# Altium PCB EMGintegrated.PcbDoc
Units mil, origin at the board's own origin, x right, y up, seen from the top; angles counter-clockwise.
Board outline 1400 x 890 mil, 4 copper layers (Signal1, Ground, Power, Signal2), stack 61.2 mil thick; 62 components, 38 nets, 219 pads, 38 vias.
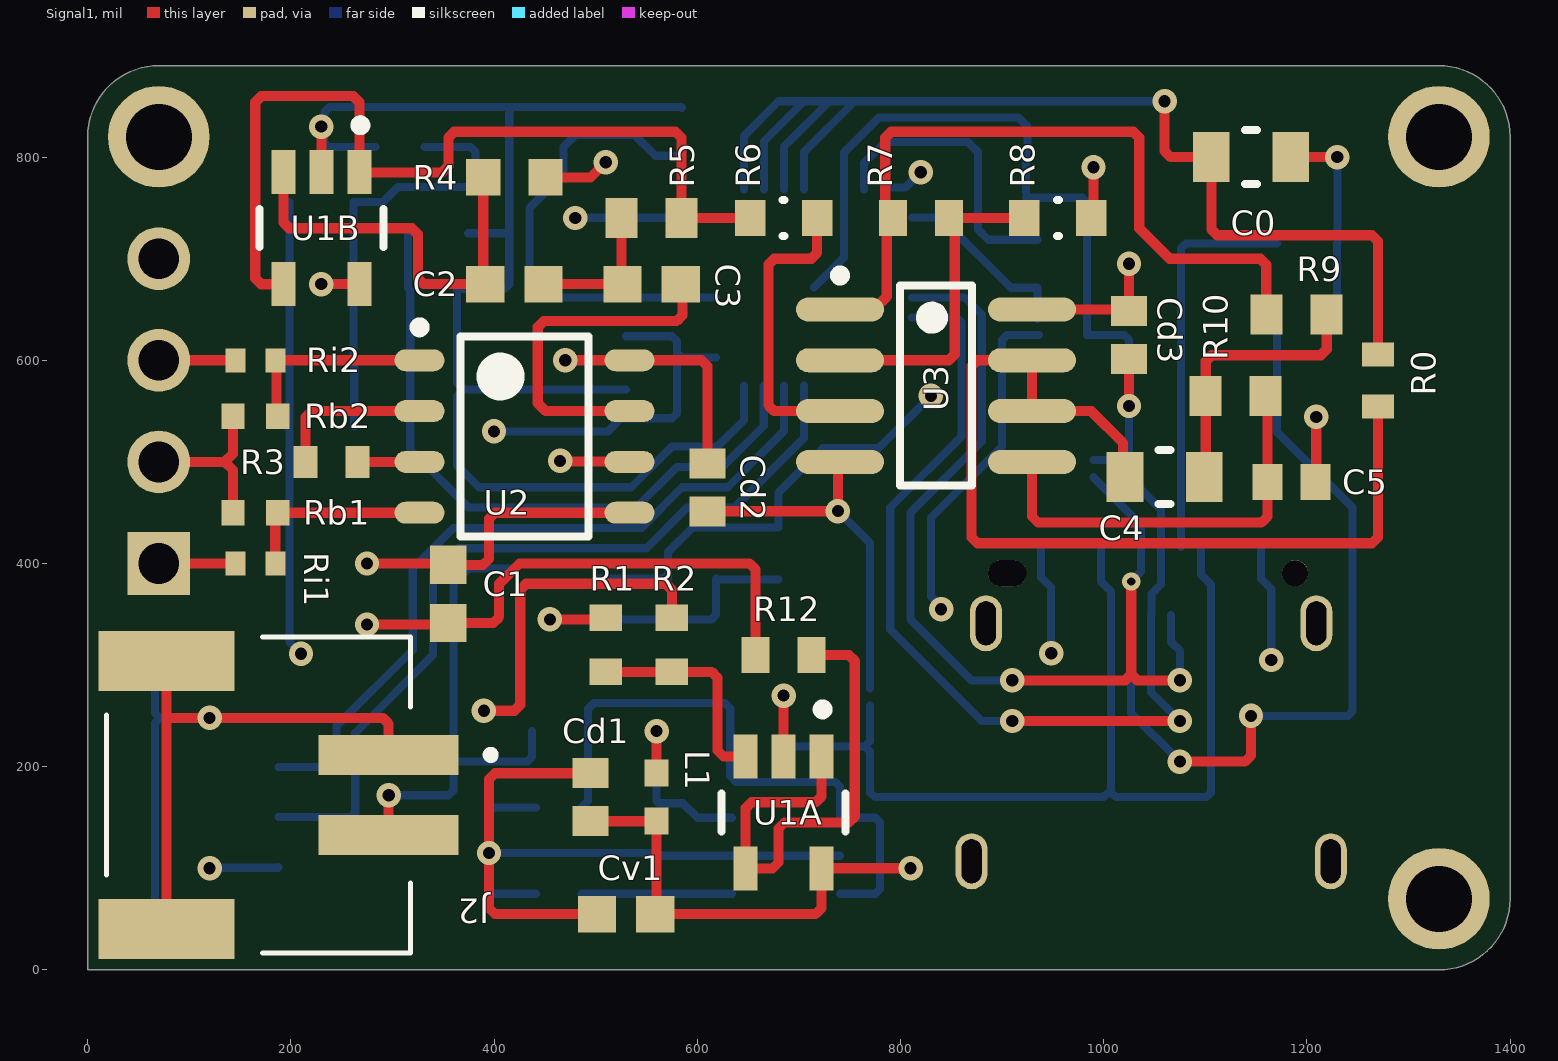
[diagram p0: Signal1 view]
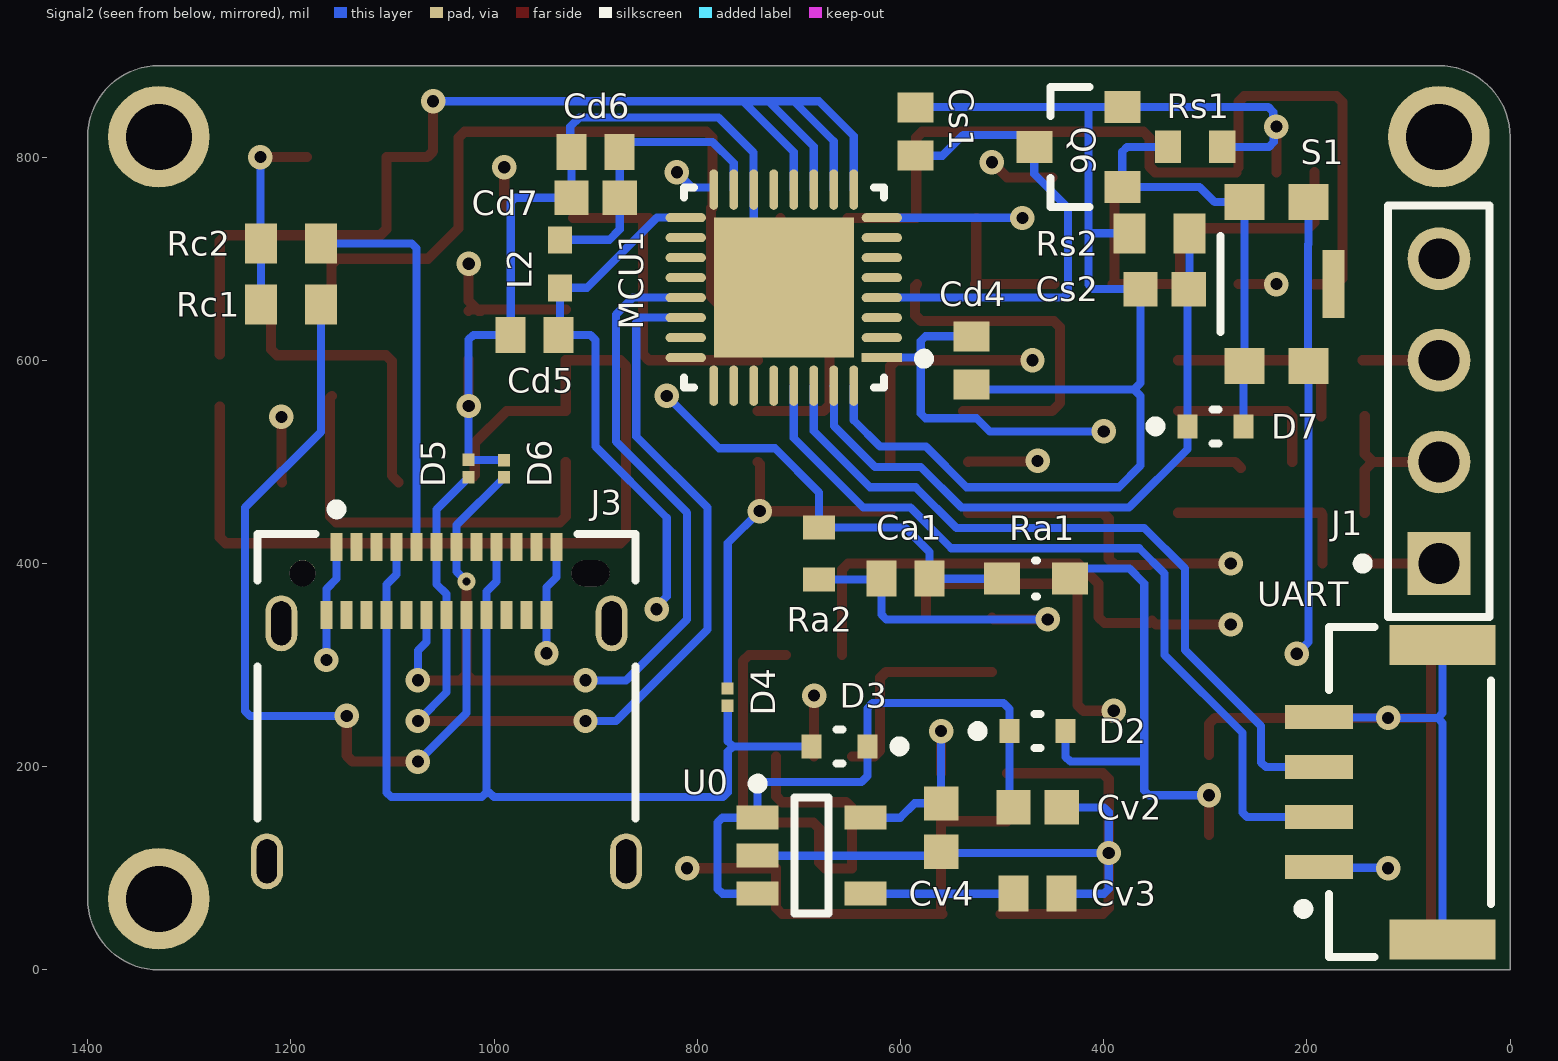
[diagram p1: Signal2 view, seen from below]
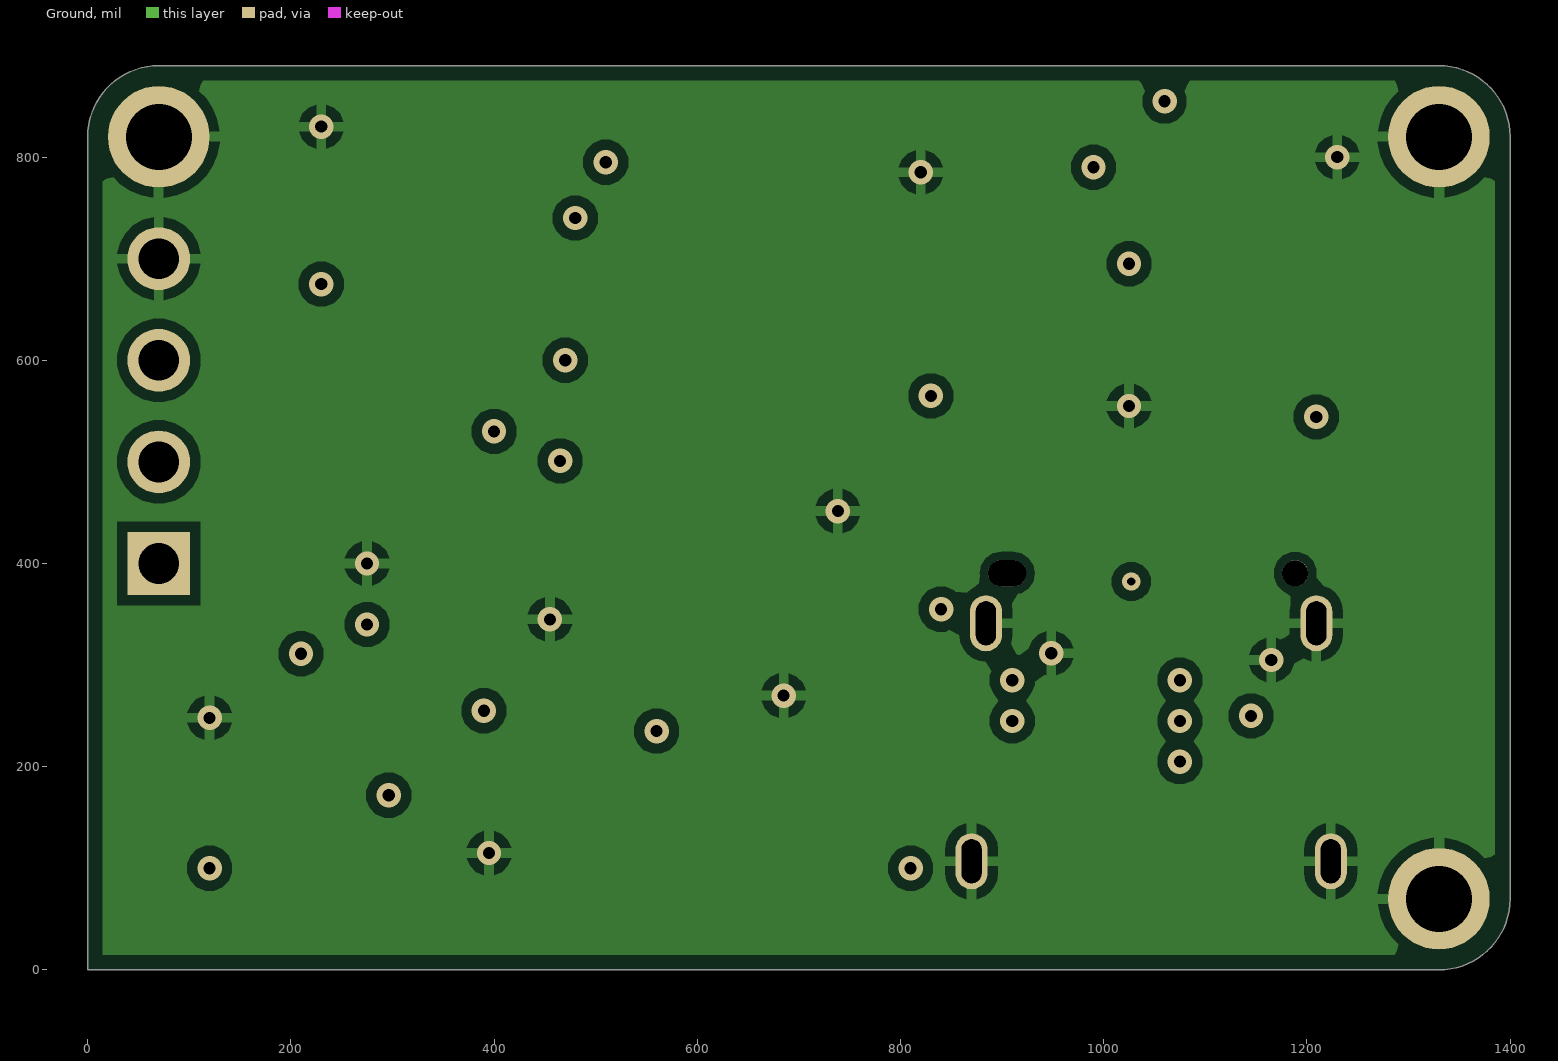
[diagram p2: Ground]
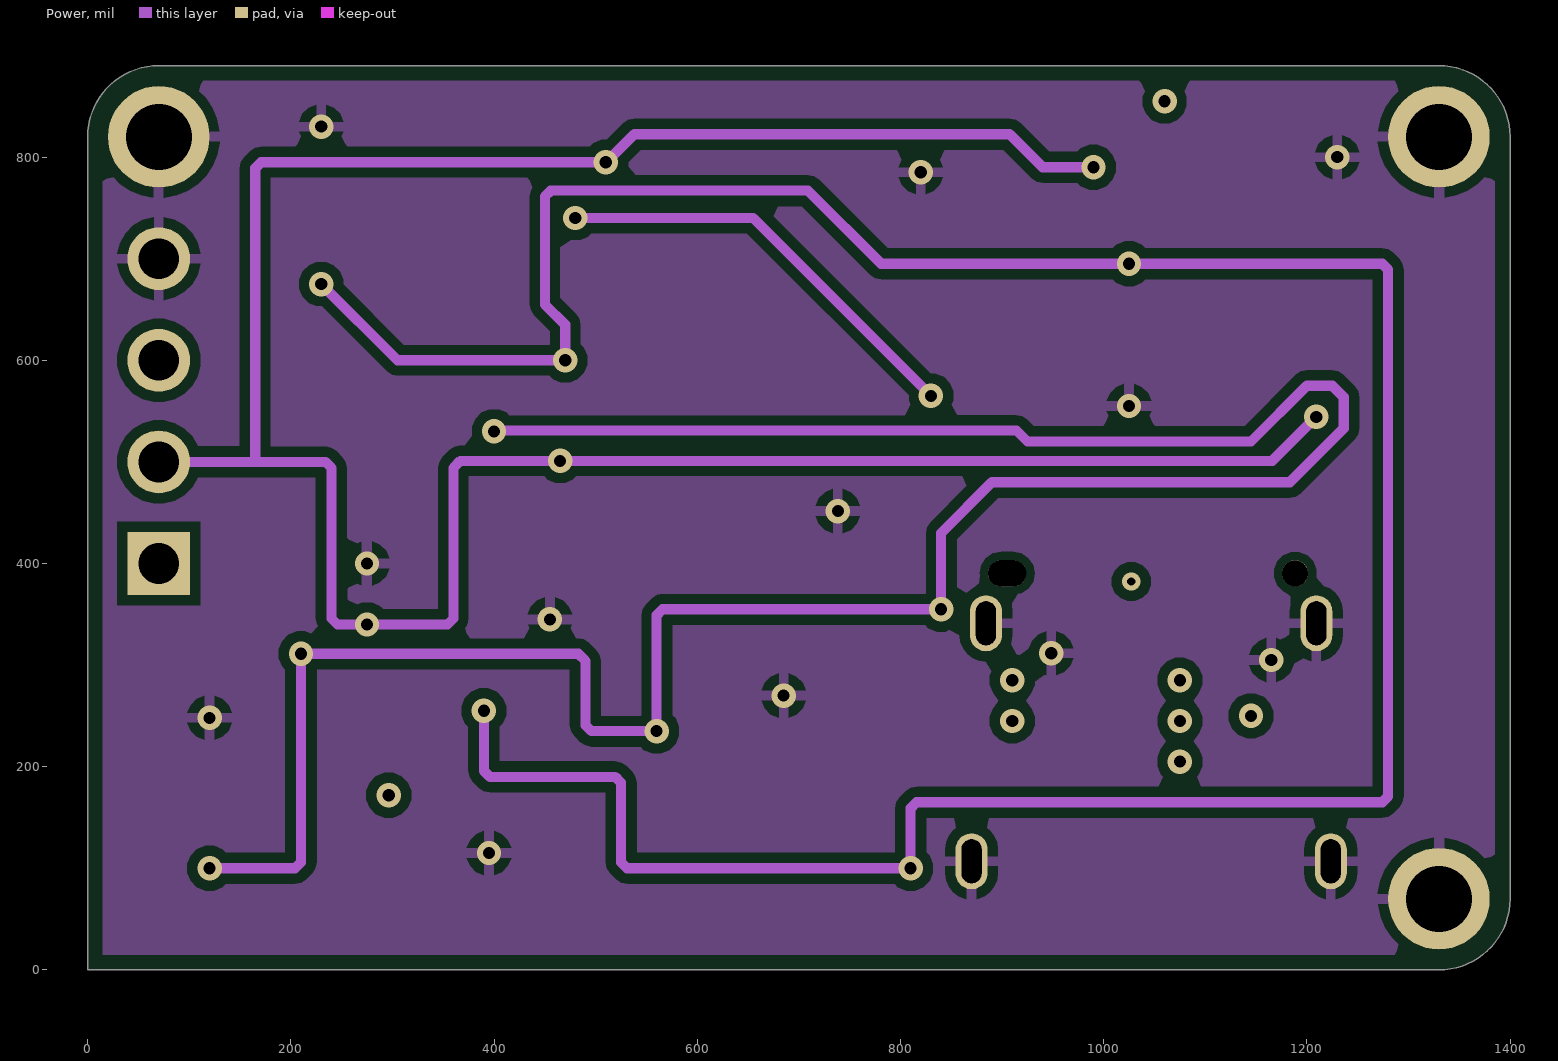
[diagram p3: Power]
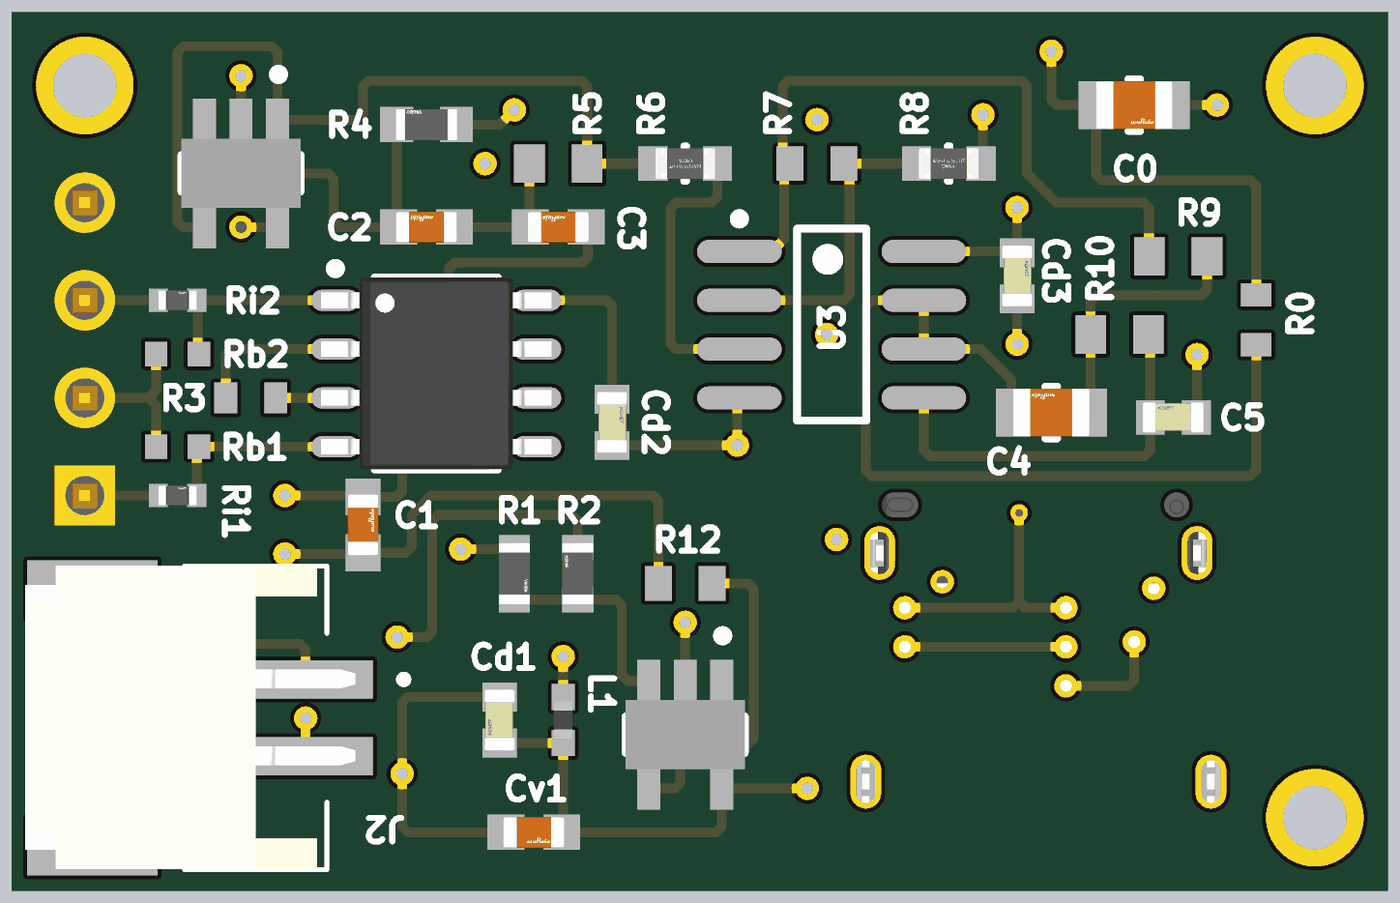
[diagram p4: 3D render of the assembled board from above, using the file's embedded part models]
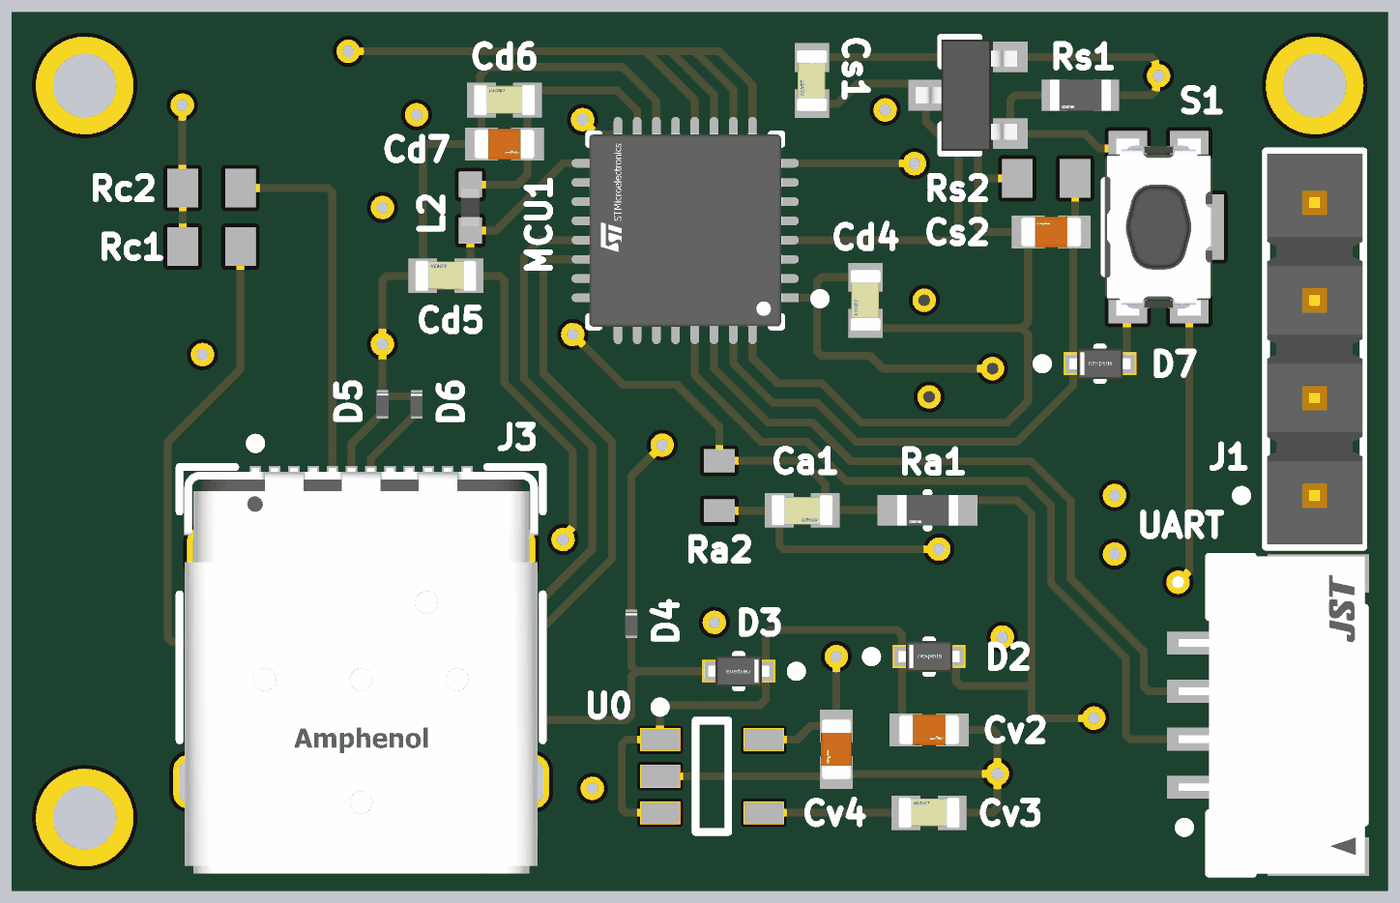
[diagram p5: 3D render of the assembled board from below, using the file's embedded part models]

## Layer stack, top to bottom
Top Solder: solder mask 0.4, Solder Resist, Dk 3.5
Signal1: signal copper 1.4
Dielectric 2: prepreg 10, PP-006, Dk 4.1
Ground: signal copper 1.4
Dielectric 1: dielectric 35.6, FR-4, Dk 4.8
Power: signal copper 1.4
Dielectric 5: prepreg 10, PP-006, Dk 4.1
Signal2: signal copper 1.4
Bottom Solder: solder mask 0.4, Solder Resist, Dk 3.5

## Board outline
0,0 1330,0 ccw(c1330,70) 1400,70 1400,820 ccw(c1330,820) 1330,890 70,890 ccw(c70,820) 0,820

## Design rules (kind name [scope] priority, off if disabled: settings)
Clearance [All] p1: gap=10 ignorepadtopadclearanceinfootprint=TRUE except(5: Arc-SMDPad Arc-Text Track-SMDPad Track-Text SMDPad-SMDPad SMDPad-Text THPad-Text Via-Text Fill-Text Poly-Text Region-Text Text-Text; 8: Arc-Arc Arc-Track Arc-THPad Arc-Via Arc-Hole Track-Track Track-THPad Track-Via Track-Hole SMDPad-THPad SMDPad-Via SMDPad-Hole THPad-THPad THPad-Via THPad-Hole Via-Via Via-Hole Fill-Hole Poly-Hole Region-Hole Text-Hole)
PolygonConnect [All] p1: connectstyle=Relief reliefconductorwidth=10 reliefentries=4 polygonreliefangle="90 Angle" airgapwidth=10
RoutingVias [All] p1: holewidth=12 width=24 viastyle="Through Hole" minholewidth=8 minwidth=18 maxholewidth=28 maxwidth=50
SolderMaskExpansion [All] p1: expansion=4 istentingtop=FALSE
Width "Bottom Width" [OnLayer('Signal2')] p1: maxlimit=10 minlimit=8 preferedwidth=8
Width [All] p2: maxlimit=10 minlimit=10 preferedwidth=10
30 further rules are at their usual default settings.

## Classes and differential pairs
component class U_Powereg: Cv2 Cv3 Cv4 D2 D3 U0
component class VREF: C1 Cd1 R1 R2 R12 U1A
component class LPF(500Hz): C4 C5 Cd3 R9 R10
component class HPF(20Hz): C2 C3 R4 R5 U1B
component class EMGintegrated: Ca1 Cd4 Cd5 Cd6 Cd7 Cs1 Cs2 D4 D5 D6 D7 J1 J2 J3 L2 MCU1 Q6 Ra1 Ra2 Rc1 Rc2 Rs1 Rs2 S1 UART
component class U_EMGfrontend: C0 Cv1 L1 R0 Rb1 Rb2 Ri1 Ri2
component class AMP2: R6 R7 R8 U3
component class AMP1: Cd2 R3 U2

## Components (designator, comment, footprint, x,y, rotation, side; value= is the part's Value field where it differs from the comment)
C0 "GRM2165C1H223JA01D" FP-GRM216-0_1-0_05-D 1145,800 r0 top
C1 "GRT188R61H105KE13D" FP-GRT188-0_1-E0_2_0_5-IPC_B 355,370 r90 top
C2 "GRT188R61H105KE13D" FP-GRT188-0_1-E0_2_0_5-IPC_B 420,675 r180 top
C3 "GRT188R61H105KE13D" FP-GRT188-0_1-E0_2_0_5-IPC_B 555,675 r180 top
C4 "GRM2165C1H223JA01D" FP-GRM216-0_1-0_05-D 1060,485 r180 top
C5 "C0603C103J3GAC7411" FP-C0603C-CF-MFG 1185,480 r0 top value="10,000 pF"
Ca1 "C0603C104J5RACTU" FP-C0603C-CF-MFG 595,385 r0 bottom value="0.10 μF"
Cd1 "C0603C104J5RACTU" FP-C0603C-CF-MFG 495,170 r90 top value="0.10 μF"
Cd2 "C0603C104J5RACTU" FP-C0603C-CF-MFG 610,475 r270 top value="0.10 μF"
Cd3 "C0603C104J5RACTU" FP-C0603C-CF-MFG 1025,625 r270 top value="0.10 μF"
Cd4 "C0603C104J5RACTU" FP-C0603C-CF-MFG 530,600 r90 bottom value="0.10 μF"
Cd5 "C0603C104J5RACTU" FP-C0603C-CF-MFG 960,625 r180 bottom value="0.10 μF"
Cd6 "C0603C104J5RACTU" FP-C0603C-CF-MFG 900,805 r180 bottom value="0.10 μF"
Cd7 "GRT188R61C475KE13D" FP-GRT188-0_15-IPC_C 900,760 r180 bottom
Cs1 "C0603C104J5RACTU" FP-C0603C-CF-MFG 585,825 r90 bottom value="0.10 μF"
Cs2 "GRT188R61C475KE13D" FP-GRT188-0_15-IPC_C 340,670 r0 bottom
Cv1 "GRT188R61H105KE13D" FP-GRT188-0_1-E0_2_0_5-IPC_B 530,55 r0 top
Cv2 "GRT188R61C475KE13D" FP-GRT188-0_15-IPC_C 465,160 r180 bottom
Cv3 "C0603C103J3GAC7411" FP-C0603C-CF-MFG 465,75 r180 bottom value="10,000 pF"
Cv4 "GRT188R61C475KE13D" FP-GRT188-0_15-IPC_C 560,140 r270 bottom
D2 "1PS79SB30YL" FP-SOD523-MFG 465,235 r180 bottom
D3 "1PS79SB30YL" FP-SOD523-MFG 660,220 r0 bottom
D4 "SZESD8472MUT5G" FP-152AF-MFG 770,268.46 r270 bottom
D5 "SZESD8472MUT5G" FP-152AF-MFG 1025,493.46 r270 bottom
D6 "SZESD8472MUT5G" FP-152AF-MFG 990,493.27 r270 bottom
D7 "1PS79SB30YL" FP-SOD523-MFG 290,535 r180 bottom
J1 "HTSW-104-07-G-S" FP-HTSW-104-07-G-S-MFG 70,550 r90 bottom
J2 "S2B-PH-SM4-TB" JST_S2B-PH-SM4-TB 187.99,172.24 r270 top
J3 "12401610E4#2A" FP-12401610E4#2A-MFG 1046.77,218.5 r180 bottom
L1 "7427927170" SMD-0402 560,170 r270 top
L2 "7427927170" SMD-0402 935,695 r90 bottom
MCU1 "STM32G431KBU6" FP-UFQFPN32-A0B8-IPC_A 714.84,671.51 r0 bottom locked
Q6 "2N7002H6327XTSA2" FP-PG-SOT23-3-MFG 425,810 r0 bottom
R0 "RC0603FR-07470RL" RESC1608X55X25LL10T15 1270,580 r90 top
R1 "RC0603FR-0710KL" FP-RC0603-0_55-IPC_C 510,320 r270 top
R2 "RC0603FR-0710KL" FP-RC0603-0_55-IPC_C 575,320 r90 top
R3 "RC0603FR-0715KL" RESC1608X55X25LL10T15 240,500 r180 top
R4 "AC0603FR-1311KL" FP-AC0603-IPC_B 420,780 r180 top
R5 "RC0603FR-075K6L" RESC1608X55X25ML10T15 555,740 r0 top
R6 "RP73PF1J1K0BTDF" FP-RP73P-1J-MFG 685,740 r0 top value=1KΩ
R7 "RC0603FR-0762KL" RESC1608X55X25NL10T15 820,740 r180 top
R8 "RP73PF1J1K0BTDF" FP-RP73P-1J-MFG 955,740 r180 top value=1KΩ
R9 "RC0603FR-0722KL" RESC1608X55X25ML10T15 1190,645 r0 top
R10 "RC0603FR-0722KL" RESC1608X55X25ML10T15 1130,565 r0 top
R12 "RC0603FR-0722RL" RESC1608X55X25NL10T15 685,310 r180 top
Ra1 "RC0603FR-07100KL" FP-RC0603-0_55-MFG 466.54,385 r0 bottom
Ra2 "RC0603FR-0739KL" RESC1608X55X25LL10T15 680,410 r90 bottom
Rb1 "RC0402FR-0710ML" RESC1005X40X25MML05T10 165,450 r180 top
Rb2 "RC0402FR-0710ML" RESC1005X40X25MML05T10 165,545 r180 top
Rc1 "RC0603FR-075K1L" RESC1608X55X25ML10T15 1200,655 r180 bottom
Rc2 "RC0603FR-075K1L" RESC1608X55X25ML10T15 1200,715 r180 bottom
Ri1 "RC0402FR-075KL" FP-RC0402-MFG-TINY 165,400 r0 top value=5kΩ
Ri2 "RC0402FR-075KL" FP-RC0402-MFG-TINY 165,600 r0 top value=5kΩ
Rs1 "RC0603FR-0710KL" FP-RC0603-0_55-IPC_C 310,810 r0 bottom
Rs2 "RC0603FR-07470KL" RESC1608X55X25ML10T15 345,725 r0 bottom
S1 "KMR221GLFS" SW_KMR221GLFS 230,675 r270 bottom
U0 "LP2985-33DBVRE4" TI-DBV5_V 687.44,112.4 r180 bottom
U1A "MCP6001T-E/OTVAO" FP-C04-091-OT-MFG 685,155 r270 top locked
U1B "MCP6001T-E/OTVAO" FP-C04-091-OT-MFG 230,730 r270 top locked
U2 "AD8226ARZ" ADI-R-8_L 430,525 r0 top locked
U3 "MCP6002T-E/SN" SOIC-SN8_N 835,575 r0 top locked
UART "SM04B-GHS-TB(LF)(SN)" FP-SM04B-GHS-TB_LF_SN-MFG 98.43,175 r90 bottom

## Footprints (in the part's own frame and the unit in brackets; to place one, negate y for a bottom-side part, rotate by r counter-clockwise, add the part's x,y. Pads: shape width x height; smd on the part's side, far side on the other; paste and mask are expansions set on the pad)
ADI-R-8_L [mm] "SOIC, 8-Leads, Body 5x4mm, Pitch 1.27mm, IPC High Density"
  oval 1.25x0.55 smd: 1(-2.625,1.905) 2(-2.625,0.635) 3(-2.625,-0.635) 4(-2.625,-1.905) 5(2.625,-1.905) 6(2.625,-0.635) 7(2.625,0.635) 8(2.625,1.905)
  silkscreen extent -2.75,-2.5 1.6,2.85, body extent -3,-2.5 3,2.5, height 1.75
FP-152AF-MFG [mm]
  rect 0.31x0.3 smd paste+0 mask+0: 1(-0.215,0) 2(0.215,0)
  body extent -0.31,-0.16 0.31,0.16, height 0.33
FP-12401610E4#2A-MFG [mm]
  oval 0.8x1.4 hole 0.5 slot 1.1 at 90 deg: 1(-4.13,3.115) 2(4.13,3.115) 3(-4.49,-2.835) 4(4.49,-2.835)
  rect 0.3x0.7 smd paste+0 mask+0: A1(-2.75,5.025) A2(-2.25,5.025) A3(-1.75,5.025) A4(-1.25,5.025) A5(-0.75,5.025) A6(-0.25,5.025) A7(0.25,5.025) A8(0.75,5.025) A9(1.25,5.025) A10(1.75,5.025) A11(2.25,5.025) A12(2.75,5.025) B1(2.5,3.325) B2(2,3.325) B3(1.5,3.325) B4(1,3.325) B5(0.5,3.325) B6(0,3.325) B7(-0.5,3.325) B8(-1,3.325) B9(-1.5,3.325) B10(-2,3.325) B11(-2.5,3.325) B12(-3,3.325)
  round 0.65 hole 0.65 unplated: ""(-3.6,4.365)
  oval 0.95x0.65 hole 0.65 slot 0.95 at 0 deg unplated: ""(3.6,4.365)
  silkscreen extent -4.72,-1.76 4.72,6.09, body extent -4.6,-5.23 4.6,5.33, height 3.43
FP-AC0603-IPC_B [mil]
  rect 33.81x35.91 smd paste+0 mask+0: 1(-30.58,0) 2(30.58,0)
  body extent -57,-28 57,28, height 10
FP-C04-091-OT-MFG [mm]
  rect 1.1x0.6 smd paste+0 mask+0: 1(-1.4,0.95) 2(-1.4,0) 3(-1.4,-0.95) 4(1.4,-0.95) 5(1.4,0.95)
  silkscreen extent -2.7,-1.55 0.48,1.55, body extent -2.05,-1.9 2.05,1.9, height 0.25
FP-C0603C-CF-MFG [mm]
  rect 0.75x0.9 smd paste+0 mask+0: 1(-0.6,0) 2(0.6,0)
  body extent -0.8,-0.4 0.8,0.4, height 0.87
FP-GRM216-0_1-0_05-D [mil]
  rect 36x49.21 smd paste+0 mask+0: 1(-39,0) 2(39,0)
  silkscreen extent -6,-27 6,27, body extent -51,-31 51,31, height 10
FP-GRT188-0_1-E0_2_0_5-IPC_B [mil]
  rect 37.74x35.91 smd paste+0 mask+0: 1(-28.61,0) 2(28.61,0)
  body extent -57,-28 57,28, height 10
FP-GRT188-0_15-IPC_C [mil]
  rect 33.71x33.79 smd paste+0 mask+0: 1(-23.66,0) 2(23.66,0)
  body extent -31,-16 31,16, height 37
FP-HTSW-104-07-G-S-MFG [mm]
  rect 1.57x1.57 hole 1.02 paste-2539.97 mask+0: 1(-3.81,0)
  round 1.57 hole 1.02 paste-2539.97 mask+0: 2(-1.27,0) 3(1.27,0) 4(3.81,0)
  silkscreen extent -5.14,-1.27 5.14,2.03, body extent -5.08,-1.25 5.08,1.24, height 8.71
FP-PG-SOT23-3-MFG [mm]
  rect 0.9x0.8 smd paste+0 mask+0: 1(-1.1,1) 2(-1.1,-1) 3(1.1,0)
  silkscreen extent -0.28,-1.5 0.7,1.5, body extent -1.27,-1.45 1.37,1.45, height 1.04
FP-RC0402-MFG-TINY [mm]
  rect 0.5x0.6 smd paste+0 mask+0: 1(-0.5,0) 2(0.5,0)
  body extent -0.85,-0.4 0.85,0.4, height 0.25
FP-RC0603-0_55-IPC_C [mil]
  rect 25.93x31.97 smd paste+0 mask+0: 1(-26.64,0) 2(26.64,0)
  body extent -31,-16 31,16, height 22
FP-RC0603-0_55-MFG [mm]
  rect 0.9x0.8 smd paste+0 mask+0: 1(-0.85,0) 2(0.85,0)
  silkscreen extent -0.03,-0.45 0.03,0.45, body extent -0.8,-0.4 0.8,0.4, height 0.55
FP-RP73P-1J-MFG [mil]
  rect 30x35.43 smd paste+0 mask+0: 1(-33,0) 2(33,0)
  silkscreen extent -1,-18 1,18, body extent -59,-22 59,22, height 10
FP-SM04B-GHS-TB_LF_SN-MFG [mm]
  rect 0.6x1.7 smd paste+0 mask+0: 1(-1.875,2.275) 2(-0.625,2.275) 3(0.625,2.275) 4(1.875,2.275)
  rect 1x2.642 smd paste+0 mask+0: 5(-3.683,-0.813)
  rect 1x2.642 smd mask+0: 5(3.683,-0.813)
  silkscreen extent -4.13,-2.02 4.13,2.79, body extent -4.12,-2.02 4.13,2.83, height 4.35
FP-SOD523-MFG [mm]
  rect 0.5x0.6 smd paste-1000 mask+0: 1(-0.7,0) 2(0.7,0)
  silkscreen extent -1.63,-0.43 0.08,0.43, body extent -0.8,-0.4 0.8,0.4, height 0.65
FP-UFQFPN32-A0B8-IPC_A [mm]
  rect 1.01x0.222 smd paste+0 mask+0: 1(-2.451,1.75)
  rrect100% 1.01x0.222 smd paste+0 mask+0: 2(-2.451,1.25) 3(-2.451,0.75) 4(-2.451,0.25) 5(-2.451,-0.25) 6(-2.451,-0.75) 7(-2.451,-1.25) 8(-2.451,-1.75) 17(2.451,-1.75) 18(2.451,-1.25) 19(2.451,-0.75) 20(2.451,-0.25) 21(2.451,0.25) 22(2.451,0.75) 23(2.451,1.25) 24(2.451,1.75)
  rrect100% 0.222x1.01 smd paste+0 mask+0: 9(-1.75,-2.451) 10(-1.25,-2.451) 11(-0.75,-2.451) 12(-0.25,-2.451) 13(0.25,-2.451) 14(0.75,-2.451) 15(1.25,-2.451) 16(1.75,-2.451) 25(1.75,2.451) 26(1.25,2.451) 27(0.75,2.451) 28(0.25,2.451) 29(-0.25,2.451) 30(-0.75,2.451) 31(-1.25,2.451) 32(-1.75,2.451)
  rect 3.5x3.5 smd paste-1000 mask+0: 33(0,0)
  silkscreen extent -3.63,-2.5 2.5,2.5, body extent -2.51,-2.51 2.51,2.51, height 0.6
JST_S2B-PH-SM4-TB [mm]
  rect 1x3.5 smd paste+0 mask+0.102: 1(-1,2.75) 2(1,2.75)
  rect 1.5x3.4 smd paste+0 mask+0.102: T1(-3.35,-2.8) T2(3.35,-2.8)
  silkscreen extent -3.95,-4.3 3.95,5.4, body extent -3.96,-4.55 3.94,4.05, height 5.5
RESC1005X40X25MML05T10 [mil] "Chip Resistor, 2-Leads, Body 1.00x0.50mm, IPC High Density"
  rect 23x25 smd: 1(-22,0) 2(22,0)
  body extent -21,-11 21,11, height 16
RESC1608X55X25LL10T15 [mm] "Chip Resistor, 2-Leads, Body 1.60x0.80mm, IPC High Density"
  rect 0.6x0.8 smd: 1(-0.65,0) 2(0.65,0)
  body extent -0.85,-0.45 0.85,0.45, height 0.55
RESC1608X55X25ML10T15 [mm] "Chip Resistor, 2-Leads, Body 1.70x0.90mm, IPC Low Density"
  rect 0.8x1 smd: 1(-0.75,0) 2(0.75,0)
  body extent -0.85,-0.45 0.85,0.45, height 0.55
RESC1608X55X25NL10T15 [mm] "Chip Resistor, 2-Leads, Body 1.70x0.90mm, IPC Medium Density"
  rect 0.7x0.9 smd: 1(-0.7,0) 2(0.7,0)
  body extent -0.85,-0.45 0.85,0.45, height 0.55
SMD-0402 [mm] "Chip Inductor, 2-Leads, Body 1.0x0.5mm"
  rect 0.675x0.6 smd: 1(-0.6,0) 2(0.6,0)
  body extent -0.5,-0.25 0.5,0.25, height 0.49
SOIC-SN8_N [mm] "SOIC, 8-Leads, Body 4.9x3.9mm, Pitch 1.27mm, IPC Medium Density"
  oval 2.2x0.6 smd: 1(-2.4,1.905) 2(-2.4,0.635) 3(-2.4,-0.635) 4(-2.4,-1.905) 5(2.4,-1.905) 6(2.4,-0.635) 7(2.4,0.635) 8(2.4,1.905)
  silkscreen extent -2.52,-2.5 0.9,2.88, body extent -2,-2.5 2,2.5, height 1.75
SW_KMR221GLFS [mm]
  rect 0.9x1 smd: 1(-2.05,0.8) 2(-2.05,-0.8) 3(2.05,-0.8) 4(2.05,0.8)
  rect 1.7x0.55 smd: 5(0,1.425)
  silkscreen extent -1.2,-1.4 1.2,-1.4, body extent -2.3,-1.4 2.3,1.4, height 1.9
TI-DBV5_V [mm] "SOT23, 5-Leads, Body 2.9x1.6mm, Pitch 0.95mm"
  rect 1.05x0.6 smd paste-0.025 mask+0.07: 1(-1.35,0.95) 2(-1.35,0) 3(-1.35,-0.95) 4(1.35,-0.95) 5(1.35,0.95)
  silkscreen extent -1.48,-1.45 0.43,1.92, body extent -0.8,-1.45 0.8,1.45, height 1.45

## Part data
C0 C4: library part CMP-06035-050815-1, "Chip Multilayer Ceramic Capacitors for General Purpose, 0805, 22000pF, C0G, 30ppm/°C, 5%, 50V"
C1 C2 C3 Cv1: library part CMP-06035-031856-1, "Multi-Layer Ceramic Capacitor 1uF 50V X5R ±10% 0603 Paper T/R", Capacitance=1uF, Case Code (Imperial)=0603, Case Code (Metric)=1608, Dielectric=X5R, Max Operating Temperature=85°C, Min Operating Temperature=-55°C, Ratings=AEC-Q200, Tolerance=10%, Voltage Rating=50V, Case/Package=0603, Length=0.063inch, Mount="Surface Mount", Packaging="Tape and Reel", Thickness=0.035inch, Voltage Rating (DC)=50V, Width=0.031inch
C5 Cv3: library part CMP-03020-031050-2, "C0603 10,000 pF C0G 30ppm/°C 5.00% 25 V", Capacitance="10,000 pF", Manufacturer=KEMET, Package=C0603C-CF, Temperature="-55°C to +125°C", Temperature Characteristic=C0G, Temperature Coefficient=30ppm/°C, Temperature Range High=+125°C, Temperature Range Low=-55°C, Tolerance=0.05, Voltage Rating="25 V", Automotive=Yes, Automotive Grade="Grade 1", Category=Cap, ComponentLink2Description=Datasheet, ComponentLink2URL=https://api.kemet.com/component-edge/download/datasheet/C0603C100J5GACAUTO.pdf, Device Class L1="Passive Components", Device Class L2=Capacitors, Device Class L3="Ceramic Capacitors", Height=0.87mm, Lead Free=Yes, Manufacturer Part Number=C0603C103J3GAC7411, Material=Ceramic, Octopart=https://octopart.com/c0603c103j3gac7411-kemet-91893810, RoHS=TRUE
Ca1 Cd1 Cd2 Cd3 Cd4 Cd5 Cd6 Cs1: library part CMP-2006-03056-2, "CAP CER 0.1UF 50V 5% X7R 0603", Capacitance="0.10 μF", Manufacturer=KEMET, Package=C0603C-CF, Temperature="-55°C to +125°C", Temperature Characteristic=X7R, Temperature Coefficient=30ppm/°C, Temperature Range High=+125°C, Temperature Range Low=-55°C, Tolerance=0.05, Voltage Rating="50 V", Automotive=Yes, Automotive Grade="Grade 1", Category=Cap, ComponentLink2Description=Datasheet, ComponentLink2URL=https://api.kemet.com/component-edge/download/datasheet/C0603C100J5GACAUTO.pdf, Device Class L1="Passive Components", Device Class L2=Capacitors, Device Class L3="Ceramic Capacitors", Digikey Description="CAP CER 0.1UF 50V 5% X7R 0603", Height=0.87mm, Lead Free=Yes, Manufacturer Part Number=C0603C104J5RACTU, Material=Ceramic, Mouser Description="Multilayer Ceramic Capacitors MLCC - SMD/SMT 50volts 0.1uF X7R 5%", Octopart=https://octopart.com/c0603c104j5ractu-kemet-10440638, RoHS=TRUE
Cd7 Cs2 Cv2 Cv4: library part CMP-06035-009119-1, "Multi-Layer Ceramic Capacitor 4.7uF 16V X5R ±10% 0603 Paper T/R", Capacitance=4.7uF, Case Code (Imperial)=0603, Case Code (Metric)=1608, Max Operating Temperature=85°C, Min Operating Temperature=-55°C, Ratings=AEC-Q200, Tolerance=10%, Voltage Rating=16V, Case/Package=0603, Length=0.063inch, Mount="Surface Mount", Packaging="Cut Tape", Thickness=0.035inch, Width=0.031inch
D2 D3 D7: library part CMP-14398-000044-1, "Schottky Diode, Single, 150Deg C, Sod523 Rohs Compliant: Yes"
D4 D5 D6: library part CMP-07200-000010-1, "TVS DIODE 5.3V 14V 2X3DFN", Capacitance=0.3pF, Case/Package=DFN, Clamping Voltage=14V, Max Operating Temperature=150°C, Min Breakdown Voltage=7V, Min Operating Temperature=-55°C, Peak Pulse Current=3A, Power Line Protection=No, Resistor Type=Zener, Reverse Standoff Voltage=5.3V, Direction=Bidirectional, Element Configuration=Single, Lead Free="Lead Free", Mount="Surface Mount", Number of Bidirectional Channels=1, Number of Pins=2, Packaging="Tape and Reel", RoHS Compliant=Yes, Working Voltage=5.3V
J1: library part CMP-02766-001776-1, "CONN HEADER VERT 4POS 2.54MM", Contact Material=Bronze, Contact Plating=Gold, Gender=Male, Mount="Through Hole", Number of Contacts=4, Number of Rows=1, Packaging=Bulk, Pitch=2.54mm, Radiation Hardening=No, Reach SVHC Compliant=Yes, RoHS Compliant=Yes, Series=HTSW, Termination="Through Hole"
J2: Manufacturer="JST Sales", MAXIMUM_PACKAGE_HEIGHT=5.5mm, MPN=S2B-PH-SM4-TB, STANDARD="Manufacturer Recommendations", UNIT=MM
J3: library part CMP-02355-000003-1, "CONN RCP USB3.1 TYPEC 24P SMD RA", Connector Type=USB, Gender=Receptacle, Mount="Surface Mount", Number of Contacts=24, Number of Pins=24, Packaging="Cut Tape"
L1 L2: library part CMP-0220-00142-1, "SMD EMI Suppression Ferrite Bead WE-CBF, Z = 75 Ohm", ComponentLink1Description="Manufacturer Link", ComponentLink1URL=http://www.we-online.com, ComponentLink2Description=Datasheet, ComponentLink2URL=http://www.we-online.de/katalog/media/pdf/7427927170.pdf, DatasheetVersion="ver 1, Jul-2009", Impedance="75 Ohm", PackageDescription="Chip Inductor, 2-Leads, Body 1.0 x 0.5 mm", PackageReference=SMD-0402, PackageVersion=2009
MCU1: library part CMP-12105-000119-1, "IC MCU 32BIT 128KB FLSH 32UFQFPN", RoHS Compliant=Yes
Q6: library part CMP-32901-000180-1, "MOSFET N-CH 60V 0.3A SOT23", Case/Package=SOT-23, Continuous Drain Current (ID)=300mA, Drain to Source Voltage (Vdss)=60V, Gate to Source Voltage (Vgs)=20V, Input Capacitance=20pF, Max Operating Temperature=150°C, Max Power Dissipation=500mW, Min Operating Temperature=-55°C, Halogen Free="Halogen Free", Lead Free="Lead Free", Max Dual Supply Voltage=60V, Mount="Surface Mount", Number of Pins=3, Packaging="Tape and Reel", Rds On Max=3R, Rise Time=3.3ns
R0: library part CMP-1659-00035-2, "General Purpose Chip Resistor, 470 Ohm, +/- 1%, -55 to 155 degC, 0603 (1608 Metric), RoHS, Tape and Reel", Max Operating Temperature="90 degC", Min Operating Temperature="-40 degC", Package Quantity=2500, Resistance="470 Ohm", ComponentLink1Description="Manufacturer URL", ComponentLink1URL=http://www.yageo.com/, ComponentLink2Description=Datasheet, ComponentLink2URL=https://datasheet.ciiva.com/11808/0900766b80f96399-11808177.pdf, Contact Material=Brass, Contact Plating=Gold, DatasheetVersion="Rev. 4, 04/2009", Fastening Type=Snap, Height="1.25 mm", Length="3 mm", Mount="Surface Mount", PackageDescription="2-Pin Surface Mount Device, Body 1.6 x 0.8 mm", PackageReference=0603, Packaging="Tape and Reel", Radiation Hardening=No, RoHSCompliant=true, Width="3.1 mm"
R1 R2 Rs1: library part CMP-2100-03664-2, "RES 10K OHM 1% 1/10W 0603", Case Code (Imperial)=0603, Case Code (Metric)=1608, Max Operating Temperature=155°C, Max Power Dissipation=100mW, Min Operating Temperature=-55°C, Resistance=10kR, Resistance Tolerance=1%, Resistor Type="Thick Film", Temperature Coefficient=100ppm/°C, Voltage Rating=75V, Voltage Rating (DC)=50V, Case/Package=0603, Construction=Rectangular, Depth=0.8mm, Features="Moisture Resistant", Height=0.45mm, Lead Free="Lead Free", Lead Pitch=0.3mm, Length=1.6mm, Military Standard=Not, Number of Pins=2, Number of Terminations=2, Packaging="Tape and Reel", Power Rating=100mW, RoHS Compliant=Yes, Series=RC, Size Code=0603, Termination=SMD/SMT, Tolerance=1%, Weight=7.1E-05oz, Width=0.8mm
R3: library part CMP-1659-00032-1, "Chip Resistor, 15 KOhm, +/- 1%, 0.1 W, -55 to 155 degC, 0603 (1608 Metric), RoHS, Tape and Reel", ComponentLink1Description="Manufacturer URL", ComponentLink1URL=http://www.yageo.com/, ComponentLink2Description=Datasheet, ComponentLink2URL=http://www.yageo.com/documents/recent/PYu-RC_Group_51_RoHS_L_04.pdf, DatasheetVersion="Rev. 4, 02/2016", PackageDescription="2-Pin Surface Mount Device, Body 1.6 x 0.8 mm", PackageReference=0603, RoHSCompliant=true
R4: library part CMP-03412-047641-1, "RES 11KΩ 1.00% 0.1W 0603", RoHS Compliant=Yes
R5: library part CMP-1012-00595-2, "Chip Resistor, 5.6 KOhm, +/- 1%, 0.1 W, -55 to 155 degC, 0603 (1608 Metric), RoHS, Tape and Reel", Case Code (Imperial)=0603, Case Code (Metric)=1608, Max Operating Temperature="155 degC", Min Operating Temperature="-55 degC", Package Quantity=5000, Power Rating="100 mW", Resistance="332 kohm", Tolerance=1%, Type (Resistor)="Thick Film", Voltage Rating="50 V", Case\Package=0603, ComponentLink1Description="Manufacturer URL", ComponentLink1URL=http://www.yageo.com/, ComponentLink2Description=Datasheet, ComponentLink2URL=http://www.yageo.com/documents/recent/PYu-RC_Group_51_RoHS_L_04.pdf, DatasheetVersion="Rev. 4, 02/2016", Height="0.45 mm", Length="1.6 mm", PackageDescription="2-Pin Surface Mount Device, Body 1.6 x 0.8 mm", PackageReference=0603, Packaging="Tape and Reel", RoHSCompliant=true, Width="0.8 mm"
R6 R8: library part CMP-03211-004517-1, "RES SMD 1K OHM 0.1% 1/6W 0603", Manufacturer="TE Connectivity", Package=RP73P-1J, Power Rating=0.166W, Resistance=1KΩ, Temperature="-55°C to +155°C", Temperature Coefficient=25ppm/°C, Temperature Range High=+155°C, Temperature Range Low=-55°C, Tolerance=0.001, Voltage Rating=100V, Automotive=No, Category=Res, ComponentLink2Description=Datasheet, ComponentLink2URL=https://www.te.com/commerce/DocumentDelivery/DDEController?Action=srchrtrv&DocNm=1773272&DocType=DS&DocLang=English, Composition="Thin Film", Device Class L1="Passive Components", Device Class L2=Resistors, Device Class L3="Chip SMD Resistors", Digikey Description="RES SMD 1K OHM 0.1% 1/6W 0603", Height=0.55mm, Ipc Land Pattern Name=RESC15580X45, Lead Free=Yes, Manufacturer Part Number=RP73PF1J1K0BTDF, Octopart=https://octopart.com/rp73pf1j1k0btdf-te+connectivity-45465729, RoHS=TRUE, Series=RP73P
R7: library part CMP-2000-04104-1, Manufacturer=Yageo, Part Number=RC0603FR-0762KL
R9 R10: library part CMP-1012-00659-3, "Chip Resistor, 22 KOhm, +/- 1%, 0.1 W, -55 to 155 degC, 0603 (1608 Metric), RoHS, Tape and Reel", Case/Package=Radial, Current Rating="290 mA", Max Operating Temperature=105degC, Min Operating Temperature=-55degC, Package Quantity=100, Resistance="2.9 Ohm", Tolerance=10%, ComponentLink1Description="Manufacturer URL", ComponentLink1URL=http://www.yageo.com/, ComponentLink2Description=Datasheet, ComponentLink2URL=http://www.yageo.com/documents/recent/PYu-RC_Group_51_RoHS_L_04.pdf, DatasheetVersion="Rev. 4, 02/2016", Diameter="8.5 mm", Height="11 mm", Lead Pitch="5 mm", Mount="Through Hole", PackageDescription="2-Pin Surface Mount Device, Body 1.6 x 0.8 mm", PackageReference=0603, Packaging=Bulk, Pins=2, Radiation Hardening=No, REACH SVHC="No SVHC", RoHSCompliant=True, Shielding=Unshielded
R12: library part CMP-1659-00033-1, "Chip Resistor, 22 Ohm, +/- 1%, 0.1 W, -55 to 155 degC, 0603 (1608 Metric), RoHS, Tape and Reel", Case\Package=SIP, Max Input Voltage="1.4 V", Max Operating Temperature="100 degC", Max Ouput Current="8 A", Min Operating Temperature="-25 degC", Package Quantity=200, ComponentLink1Description="Manufacturer URL", ComponentLink1URL=http://www.yageo.com/, ComponentLink2Description=Datasheet, ComponentLink2URL=http://www.yageo.com/documents/recent/PYu-RC_Group_51_RoHS_L_04.pdf, DatasheetVersion="Rev. 4, 02/2016", Height="19.6 mm", Length="18.5 mm", Mount="Through Hole", Output Current="8 A", PackageDescription="2-Pin Surface Mount Device, Body 1.6 x 0.8 mm", PackageReference=0603, Packaging=Rail/Tube, Pins=4, Radiation Hardening=No, REACH SVHC=Unknown, RoHSCompliant=true
Ra1: library part CMP-2100-03662-2, "RES SMD 100K OHM 1% 1/10W 0603", Case Code (Imperial)=0603, Case Code (Metric)=1608, Max Operating Temperature=155°C, Max Power Dissipation=100mW, Min Operating Temperature=-55°C, Resistance=100kR, Resistance Tolerance=1%, Resistor Type="Thick Film", Temperature Coefficient=100ppm/°C, Voltage Rating=50V, Working Voltage=75V, Case/Package=0603, Construction=Rectangular, Depth=0.8mm, Features="Moisture Resistant", Height=0.45mm, Lead Free="Lead Free", Length=1.6mm, Military Standard=Not, Number of Pins=2, Number of Terminations=2, Packaging="Tape and Reel", Power Rating=100mW, REACH SVHC="No SVHC", RoHS Compliant=Yes, Series=RC, Technology="THICK FILM", Termination=SMD/SMT, Tolerance=1%, Voltage Rating (DC)=50V, Width=0.8mm
Ra2: library part CMP-2000-06940-1, "Chip Resistor, 39 KOhm, +/- 1%, 0.1 W, -55 to 155 degC, 0603 (1608 Metric), RoHS, Tape and Reel", Case Code - in=0603, Case Code - mm=1608, Manufacturer=Yageo, Operating Temperature Range=-55Cto+155C, Package Description="2-Pin Surface Mount Device, Body 1.6 x 0.8 mm", Power Rating=100mW, Resistance=39kOhms, Temperature Coefficient=100PPM/C, Tolerance=1%, Voltage Rating=50V, Datasheet URL=http://www.yageo.com/documents/recent/PYu-RC_Group_51_RoHS_L_7.pdf, Datasheet Version="Rev. 7, 05/2017", Manufacturer URL=http://www.yageo.com/, Mounting Technology=SurfaceMount, Package Reference=0603, Packaging=Reel, Product=ThickFilmResistorsGeneralPurpose, Series=RC, Termination Style=SMD/SMT
Rb1 Rb2: library part CMP-2002-07354-1, Manufacturer="Yageo / Phycomp", Part Number=RC0402FR-0710ML
Rc1 Rc2: library part CMP-2000-04091-1, Manufacturer=Yageo, Part Number=RC0603FR-075K1L
Ri1 Ri2: library part CMP-03412-013078-1, "RES SMD 5K OHM 1% 1/16W 0402", Manufacturer=Yageo, Package=RC0402, Power Rating=0.0625W, Resistance=5kΩ, Temperature="-55°C to +155°C", Temperature Coefficient=100ppm/°C, Temperature Range High=+155°C, Temperature Range Low=-55°C, Tolerance=1%, Voltage Rating=50V, Automotive=No, Category=Res, ComponentLink2Description=Datasheet, ComponentLink2URL=http://www.yageo.com/documents/recent/PYu-RC_Group_51_RoHS_L_10.pdf, Composition="Thick Film", Device Class L1="Passive Components", Device Class L2=Resistors, Device Class L3="Chip SMD Resistors", Digikey Description="RES SMD 5K OHM 1% 1/16W 0402", Footprint Url=https://pccomponents.com/datasheets/YAGEO-20RESISTORS.PDF, Height=0.4mm, Ipc Land Pattern Name=RESC10050X35, Lead Free=Yes, Manufacturer Part Number=RC0402FR-075KL, Octopart=https://octopart.com/rc0402fr-075kl-yageo-25450038, RoHS=TRUE, Series=RC_L
Rs2: library part CMP-1659-00049-1, "Chip Resistor, 470 KOhm, +/- 1%, 0.1 W, -55 to 155 degC, 0603 (1608 Metric), RoHS, Tape and Reel", ComponentLink1Description="Manufacturer URL", ComponentLink1URL=http://www.yageo.com/, ComponentLink2Description=Datasheet, ComponentLink2URL=http://www.yageo.com/documents/recent/PYu-RC_Group_51_RoHS_L_04.pdf, DatasheetVersion="Rev. 4, 02/2016", PackageDescription="2-Pin Surface Mount Device, Body 1.6 x 0.8 mm", PackageReference=0603
S1: "Switch Tactile N.O. SPST Button Gull Wing 0.05A 32VDC 1VA 200000Cycles 2N SMD Automotive T/R", Package=None, Check_prices=https://www.snapeda.com/parts/KMR221G%20LFS/C%2526K/view-part/?ref=eda, MF=CK, MP="KMR221G LFS", SnapEDA_Link=https://www.snapeda.com/parts/KMR221G%20LFS/C%2526K/view-part/?ref=snap
U0: library part CMP-0758-00029-1, "Single Output Low Noise LDO, 150 mA, Fixed 3.3 V Output, 1.5% Tolerance, 2.2 to 16 V Input, Low IQ, 5-Pin SOT-23 (DBV), -40 to 125 degC, Green (RoHS & no Sb/Br), Tape and Reel", Manufacturer="Texas Instruments", Operating Temperature Range (degC)="-40 to 125", Accuracy (%)=1.5, ComponentLink1Description="Manufacturer URL", ComponentLink1URL=http://www.ti.com/, ComponentLink2Description=Datasheet, ComponentLink2URL=http://www.ti.com/lit/ds/symlink/lp2985-50.pdf, ComponentLink3Description="Package Specification", ComponentLink3URL=http://www.ti.com/litv/pdf/mpds018j, DatasheetVersion=SLVS522N, Fixed Output Options (V)=3.3, Iout (Max) (A)=0.15, Iq (Typ) (mA)=0.85, Mounting Technology="Surface Mount", Output Options="Fixed Output", PackageDescription="5-Pin Plastic Small Outline, Body 2.9 x 1.6 mm, Pitch 0.95 mm", PackageReference=DBV5, PackageVersion=4073253-4/L, Packing="Tape and Reel", PartNumber=LP2985-33DBVRE4, RoHS=TRUE, Vdo (Typ) (mV)=280, Vin (V)="2.2 to 16"
U1A U1B: library part CMP-06302-000184-2, "None", Ambient Temperature Range High=125°C, Case/Package=SOT-23-5, Input Bias Current=1.1nA, Input Offset Voltage (Vos)=4.5mV, Max Junction Temperature (Tj)=150°C, Max Supply Voltage=6V, Min Operating Temperature=-40°C, Min Supply Voltage=1.8V, Nominal Supply Current=100µA, Output Current per Channel=23mA, Voltage Gain=112dB, Height=1.45mm, Lifecycle Status=Production, Max Operating Temperature=125°C, NexarPartId=52876797, Number Of Channels=1, RoHS=Non-Compliant
U2: library part CMP-2000-05749-1, "Wide Supply Range, Rail-to-Rail Output Instrumentation Amplifier, 2.2 to 36 V, -40 to 125 degC, 8-Pin SOIC (R-8), RoHS, Tube", Current - Input Bias=20nA, Current - Output / Channel=13mA, Current - Supply=350µA, Manufacturer="Analog Devices", Operating Temperature=-40°C~125°C, Package / Case="8-SOIC(0.154\",3.90mmWidth)", Package Description="8-Pin Small Outline Package, Body 4.9 x 3.9 mm, Pitch 1.27 mm", Package Reference=R-8, Standard Package=98, Supplier Device Package=8-SOIC, Voltage - Input Offset=100µV, Voltage - Supply, Single/Dual (±)=2.2V~36V,±1.35V~18V, -3db Bandwidth=1.5MHz, Amplifier Type=Instrumentation, Category=IntegratedCircuits(ICs), Datasheet URL=http://www.analog.com/media/en/technical-documentation/data-sheets/AD8226.pdf, Datasheet Version="Rev. C, 09/2012", Design Resources=PLCandDCSUniversalAnalogInputUsingEither4or6-PinTerminalBlock, EDA / CAD Models=DownloadfromAcceleratedDesigns, Family=Linear-Amplifiers-Instrumentation,OPAmps,BufferAmps, Gain Bandwidth Product=-, Manufacturer URL=http://www.analog.com/, Mfg Application Notes=AutomaticExternalDefibrillator(AED)SolutionsElectromagneticFlowMeterSolutionsMotorControlSolution—ServoControlProgrammableLogicControllers(PLCs)SolutionsElectrocardiogram(ECG)Solutions, Mounting Technology=SurfaceMount, Mounting Type=SurfaceMount, Number of Circuits=1, Online Catalog=Instrumentation, Output Type=Rail-to-Rail, Packaging=Tube, PCN Design/Specification=PolyimideAlignmentTarget11/Aug/2015, Product Training Modules=CommonPhotodiodeOp-AmpCircuitProblemsandSolutionsIndirectCurrentFeedbackInstrumentationAmplifierApplicationsGuide, Series=-, Slew Rate=0.6V/µs
U3: library part CMP-0187-00363-3, "None", Case/Package=SOIC, Input Bias Current=1pA, Input Offset Voltage (Vos)=4.5mV, Max Operating Temperature=125°C, Max Supply Voltage=6V, Min Operating Temperature=-40°C, Min Supply Voltage=1.8V, Nominal Supply Current=100uA, Operating Supply Voltage=5.5V, Output Current=23mA, Package Quantity=3300, Power Supply Rejection Ratio (PSRR)=86dB, Voltage Gain=112dB, Amplifier Type="GENERAL PURPOSE", Common Mode Rejection Ratio=60dB, Gain Bandwidth Product=1MHz, Lead Free="Lead Free", Mount="Surface Mount", Number Of Channels=2, Number of Circuits=2, Number of Elements=2, Number of Pins=8, Operating Supply Current=100uA, Output Current per Channel=23mA, Packaging="Tape and Reel", Radiation Hardening=No, RoHS Compliant=Yes, Series=-, Slew Rate=0.6V/µs, Supply Current=100uA, Technology=CMOS, Unity Gain Bandwidth Product=1MHz
UART: library part CMP-17439-000411-1, "CONN HEADER SMD R/A 4POS 1.25MM", Current Rating=1A, Housing Color=Natural, Voltage Rating=50V, Contact Material=Bronze, Contact Plating=Tin, Housing Material=Nylon, Lead Free="Lead Free", Mount="Surface Mount", Number of Contacts=4, Number of Positions=4, Number of Rows=1, Orientation="Right Angle", Packaging="Cut Tape", Pitch=1.25mm, REACH SVHC="No SVHC", Series=GH, Termination=Solder

## Free pads (board coordinates)
  round 100 hole 65: 10(70,820) 10(1330,70) 10(1330,820)

## Via types
v1: diameter 24, hole 12, Signal1 to Signal2, 37 vias
v2: diameter 18, hole 8, Signal1 to Signal2, 1 vias

## Nets (pads, with @x,y where several pads share a name; then routed paths per layer and width w, separated by ;. In a path a pad name is that pad's centre, name@x,y a point inside that pad or via, vN(x,y) a via of type N, cw(c..) or ccw(c..) an arc to the next point about the centre after c; other vN are vias at no path point)
NetC0_1: C0.1 MCU1.9 MCU1.10 MCU1.11 MCU1.12 R0.2 | length 1246.7
  Signal1 w10: v1(1060,855) 1060,805.86 1065.86,800 C0.1 1106,728.86 1111.86,723 1264.14,723 1270,717.14 R0.2
  Signal2 w8: MCU1.9 645.94,820.94 680,855 705,855 ; MCU1.10 665.63,815.63 705,855 ; MCU1.11 685.31,810.31 730,855 ; MCU1.12 705,805 755,855 ; v1(1060,855) 755,855 ; 705,855 730,855 ; 730,855 755,855
NetC0_2: C0.2 C1.2 Ca1.2 Cd1.2 Cd2.2 Cd3.2 Cd4.1 Cd5.1 Cd6.1 Cd7.1 Cs1.2 Cs2.2 Cv1.1 Cv2.2 Cv3.2 Cv4.2 D4.1 D5.1 D6.1 J1.4 J2.1 J2.T1 J2.T2 J3.1 J3.2 J3.3 J3.4 J3.A1 J3.A12 J3.B1 J3.B12 MCU1.14 MCU1.16 MCU1.32 MCU1.33 pad.10 Q6.2 R1.1 Ra2.1 Rc1.1 Rc2.1 Rs1.1 Rs2.2 U0.2 U1A.2 U1B.2 U2.5 U3.4 UART.4 UART.5 | length 5583.6
  Signal1 w10: J2.T2 77.76,248.03 ; J2.T1 77.76,248.03 ; U1B.2 v1(230,830) ; v1(275,400) 353.61,400 C1.2 389.14,398.61 395,404.47 395,444.14 400.86,450 U2.5 ; J2.1 296.26,242.17 290.4,248.03 v1(120,248.03) 77.76,248.03 ; v1(455,345) 508.36,345 R1.1 ; Cd1.2 400.86,193.62 395,187.76 v1(395,115) 395,60.86 400.86,55 Cv1.1 ; Cd2.2 610.11,451.48 738.3,451.48 v1(738.41,451.59) ; U1A.2 v1(685,270) ; v1@738.41,450.69 v1(738.41,451.59) ; U3.4 738.41,497.9 v1(738.41,451.59) ; v1(1025,555) Cd3.2 ; C0.2 v1(1230,800)
  Signal2 w8: UART.5@66.43,30 66.43,243.07 71.11,247.76 71.11,248.03 ; UART.5@66.43,320 66.43,252.72 71.11,248.03 ; UART.4 187.6,248.43 120.39,248.43 v1(120,248.03) 71.11,248.03 ; Rs1.1 237.31,810 232.63,814.69 232.63,827.37 v1(230,830) 233.06,833.06 233.06,844.49 237.94,849.37 Q6.2 415,849.37 ; Rs2.2 415,725 ; v1(395,115) 395,155.31 399.69,160 Cv2.2 ; Cv3.2 399.69,75 395,79.69 395,110 400,115 Cv4.2@551.1,115 ; v1(455,345) 613.94,345 618.62,349.69 Ca1.2@618.62,384.41 ; Cd4.1@530,571.38 370,571.38 ; Cv4.2@556.1,110 Cv4.2@551.1,115 ; Cv4.2@557.44,116.34 556.1,115 Cv4.2@551.1,115 ; Cv4.2 563.94,112.4 U0.2 ; Cs1.2 584.25,849.37 415,849.37 ; Ca1.2 Ca1.2@618.62,384.41 ; MCU1.32 645.94,540.94 620,515 575,515 535,475 385,475 363.66,496.34 363.66,565.04 370,571.38 ; Ra2.1 Ca1.2@618.62,384.41 ; v1(685,270) v1@686.28,268.72 ; MCU1.33 744.37,701.03 MCU1.14 744.52,768.16 744.52,804.52 779,839 916,839 925,830 925,806.38 Cd6.1 923.62,775.04 923.66,775 Cd7.1@923.66,765 ; v1(738.41,451.59) 770,420 D4.1 ; MCU1.16 784.09,768.36 784.09,770 805,770 v1(820,785) ; Cd7.1 978.94,760 983.62,755.31 Cd5.1 1020.31,625 1025,620.31 v1(1025,555) D5.1 ; J3.A12 938.5,386.5 948.35,376.65 J3.B1 v1(948.35,311.65) ; D6.1 D5.1@1024.8,501.73 ; J3.A1 1155.04,384.96 1165,375 v1(1165,305) ; Rc1.1 Rc2.1 1230,715.47 v1(1230,800) ; 370,571.38 363.66,577.72 Cs2.2 410.31,670 415,674.69 415,725 ; 415,725 415,849.37
NetC1_1: C1.1 C5.2 J1.2 R4.1 R8.1 R12.2 Rb1.2 Rb2.2 U2.6 | length 3521.9
  Signal1 w10: J1.2 135,500 ; Rb1.2 143,492 135,500 ; Rb2.2 143,508 135,500 ; v1(275,340) 348.61,340 C1.1@352.5,343.89 ; C1.1 399.14,341.39 405,347.25 405,380 425,400 651.58,400 657.44,394.14 R12.2 ; R4.1 495,780 v1(510,795) ; v1(465,501) 465.5,500.5 532.85,500.5 U2.6 ; R8.1@988,750 990,752 v1(990,790) ; C5.2 1209.31,480.69 v1(1209.31,544.31)
  Power w10: J1.2 165,500 ; v1(465,501) 366.86,501 360,494.14 360,345.86 354.14,340 v1(275,340) 245.86,340 240,345.86 240,494.14 234.14,500 165,500 ; v1@466,501 1166,501 v1(1209.31,544.31) ; v1(510,795) 170.86,795 165,789.14 165,500 ; v1@510.53,795 538.09,822.56 907.45,822.56 940.02,790 v1(990,790)
NetC2_1: C2.1 C3.2 R5.1 | length 142.2
  Signal1 w10: C2.1 C3.2@525.47,675 ; R5.1 525.47,675.92 C3.2
NetC2_2: C2.2 R4.2 U1B.3 | length 403.6
  Signal1 w10: U1B.3 192.6,735.86 198.46,730 319.14,730 325,724.14 325,680.86 330.86,675 C2.2 ; C2.2@389.42,675 R4.2
NetC3_1: C3.1 U2.7 | length 352.4
  Signal1 w10: U2.7@538.53,550 450.86,550 443,557.86 443,632.67 448.86,638.53 579.7,638.53 585.55,644.39 585.55,673.06 C3.1
NetC4_1: C4.1 R9.2 R10.1 | length 279.9
  Signal1 w10: C4.1@1094,480 C4.1 1100.47,486.47 1100.47,599.14 1106.33,605 1213.67,605 1219.53,610.86 R9.2
NetC4_2: C4.2 R0.1 U3.6 U3.7 | length 950.6
  Signal1 w10: C4.2 1018.97,487.03 1018.97,518.75 987.71,550 U3.6 U3.7 875.86,600 870,594.14 870,425.86 875.86,420 1264.14,420 1270,425.86 R0.1
NetC5_1: C5.1 R10.2 U3.5 | length 410
  Signal1 w10: U3.5 929.49,446.25 935.35,440.39 1155.52,440.39 1161.38,446.25 C5.1 1161.38,563.15 R10.2
NetCa1_1: Ca1.1 MCU1.8 Ra1.2 Ra2.2 | length 1001
  Power w10: v1(480,740) 655,740 v1(830,565)
  Signal2 w8: v1(480,740) 480.26,740.26 618.19,740.26 MCU1.8 ; Ra1.2 567.15,385 Ca1.1@570.03,387.88 ; Ca1.1 571.38,411.38 595.59,435.59 Ra2.2 680,470 723.47,513.47 778.47,513.47 v1(830,565)
NetCd1_1: Cd1.1 Cd2.1 Cd3.1 Cv1.2 L1.2 R2.2 U1A.5 U1B.5 U2.8 U3.8 | length 4128.9
  Signal1 w10: v1(230,675) U1B.5@267.28,675 ; v1(390,255) 420,255 425.86,260.86 ccw(c419.93,260.94) 425.86,260.94 425.86,374.14 431.72,380 569.14,380 575,374.14 R2.2 ; v1(470,600) U2.8 604.14,600 610,594.14 Cd2.1 ; Cd1.1 L1.2 560,56.39 Cv1.2 716.54,55 722.4,60.86 U1A.5 ; U1A.5@722.52,100 v1(810,100) ; U3.8 Cd3.1@1016.61,650 ; Cd3.1@1012.92,648.62 1015.24,648.62 Cd3.1@1016.61,650 ; Cd3.1 1023.62,650 Cd3.1@1016.61,650 ; v1(1025,695) 1025,658.39 Cd3.1@1016.61,650
  Power w10: v1(230,675) 305,600 v1(470,600) 470,635 450,655 450,761.14 455.86,767 709.01,767 781.01,695 v1(1025,695) 1274.14,695 1280,689.14 1280,170.86 1274.14,165 815.86,165 810,159.14 v1(810,100) 530.86,100 525,105.86 525,184.14 519.14,190 395.86,190 390,195.86 v1(390,255)
NetCd4_2: Cd4.2 Cd5.2 Cv4.1 L1.1 L2.1 MCU1.1 MCU1.17 S1.1 S1.4 U0.5 UART.1 | length 4102.9
  Signal1 w10: L1.1 v1(560,235)
  Power w10: v1(120,100) 204.14,100 210,105.86 v1(210,311.19) 482.95,311.19 490,304.14 490,240.86 495.86,235 v1(560,235) 560,349.14 565.86,355 v1(840,355) 840,430 890,480 1183.18,480 1236.31,533.13 1236.31,563.69 1225,575 1200,575 1145,520 925,520 914.14,530.86 400.86,530.86 v1(400,530)
  Signal2 w8: v1(120,100) 120.59,100.59 187.4,100.59 UART.1 ; S1.4 198.5,322.69 v1(210,311.19) ; S1.1 198.5,714.48 198.72,714.26 S1.4@198.72,594.29 ; v1(400,530) 512.12,530 525.12,543 575.31,543 580,547.69 580,597.92 584.69,602.61 ; Cd4.2 575.31,623.62 580,618.94 580,607.29 584.69,602.61 ; v1(560,235) 560,166.1 562.14,163.96 586.04,163.96 600.2,149.8 U0.5 ; MCU1.1 584.69,602.61 ; MCU1.17 839.6,740.4 908.62,671.38 L2.1 Cd5.2@935,640.7 ; v1(840,355) 840,357.69 830,367.69 830,445 900,515 900,620 905,625 Cd5.2
NetCd6_2: Cd6.2 Cd7.2 L2.2 MCU1.15 | length 290.4
  Signal2 w8: MCU1.15 764.06,794.06 785,815 866.38,815 Cd6.2 876.34,804.96 Cd7.2 876.34,728.66 886.38,718.62 L2.2
NetCs1_1: Cs1.1 MCU1.4 Q6.3 | length 472.7
  Signal2 w8: Cs1.1 558.62,801.38 538.25,821.75 480.06,821.75 Q6.3 468.31,783.31 435,750 435,666.35 439.69,661.66 MCU1.4
NetCs2_1: Cs2.1 D7.1 MCU1.31 Rs2.1 | length 658.1
  Signal2 w8: Rs2.1 315.47,670.87 317.56,668.78 317.56,512.44 375,455 540,455 580,495 625,495 665.48,535.48 665.48,574.85 MCU1.31
NetCv2_1: Cv2.1 D2.1 D3.1 U0.1 U0.3 | length 600.9
  Signal2 w8: Cv2.1@486.1,160 492.56,166.46 D2.1 492.56,256.7 498.42,262.56 627.44,262.56 632.44,257.56 D3.1@632.44,220.71 ; D3.1 632.44,190.86 638.3,185 735.9,185 740.59,180.31 U0.1 775.31,149.8 780,145.12 780,79.69 775.31,75 U0.3
NetCv3_1: Cv3.1 U0.4 | length 148.2
  Signal2 w8: Cv3.1@486.06,75 U0.4
NetD2_2: D2.2 J2.2 Ra1.1 | length 479.2
  Signal1 w10: J2.2 v1(296.26,171.93)
  Signal2 w8: v1(296.26,171.93) 355.31,171.93 360,176.62 360,205 ; Ra1.1@420,395 374.69,395 360,380.31 360,205 ; D2.2 437.44,209.69 432.75,205 360,205
NetD3_2: D3.2 D4.2 J3.A4 J3.A9 J3.B4 J3.B9 | length 1001.9
  Signal2 w8: D3.2 765,220 ; D4.2 770,225 765,220 ; J3.A9 997.56,382.44 1007.4,372.6 J3.B4 1007.4,174.69 ; J3.A4 1095.98,389.02 1105.83,379.17 J3.B9 1105.83,174.69 1101.14,170 1012.09,170 1007.4,174.69 ; 765,220 770,215 770,174.69 774.69,170 1000,170 1004.69,174.69 1007.4,174.69
NetD5_2: D5.2 J3.A6 J3.B6 MCU1.22 | length 973
  Signal1 w10: v1(910,245) v1(1075,245)
  Signal2 w8: MCU1.22 855.31,641.98 860,637.29 860,525 790,455 790,335 880,245 v1(910,245) ; D5.2 1025,484.8 1056.61,453.19 J3.A6 1056.61,379.6 1046.93,369.91 1046.93,349.56 J3.B6 1046.77,273.23 v1(1075,245)
NetD6_2: D6.2 J3.A7 J3.B7 MCU1.21 | length 984.8
  Signal1 w10: v1(910,285) 1021.26,285 1027.12,290.86 ; v2(1027.12,382.19) 1027.12,290.86 ; v1(1075,285) 1032.98,285 1027.12,290.86
  Signal2 w8: MCU1.21 863.34,661.66 880,645 880,520 810,450 810,345 870,285 v1(910,285) ; D6.2@990,485 D6.2 1036.93,437.87 J3.A7 1036.93,392 v2(1027.12,382.19) ; J3.B7 1066.46,322.87 1075,314.33 v1(1075,285)
NetD7_2: D7.2 Q6.1 Rs1.2 S1.2 S1.3 | length 434.2
  Signal2 w8: D7.2 262.44,593.35 S1.3 S1.2 290.71,755.71 305.63,770.63 377.92,770.63 Q6.1 381.69,805.31 377.01,810 Rs1.2@331.64,810
NetJ1_1: J1.1 Ri1.1 | length 71.5
  Signal1 w10: J1.1 134.61,400 ; Ri1.1@140.47,404.84 Ri1.1
NetJ1_3: J1.3 Ri2.1 | length 75.3
  Signal1 w10: J1.3 Ri2.1
NetJ3_A5: J3.A5 Rc2.2 | length 390.1
  Signal2 w8: J3.A5 1076.3,710.31 1080.99,715 Rc2.2
NetJ3_B5: J3.B5 Rc1.2 | length 808.9
  Signal1 w10: v1(1075,205) 1139.14,205 1145,210.86 v1(1145,250)
  Signal2 w8: J3.B5 1027.09,252.91 v1(1075,205) ; v1(1145,250) 1240.31,250 1245,254.69 1245,455 1170.47,529.53 Rc1.2
NetMCU1_29: MCU1.29 UART.2 | length 815.9
  Signal2 w8: UART.2 258.75,150.39 263.44,155.08 263.44,233.44 340,310 340,390 365,415 550,415 590,455 636.62,455 705,523.38 MCU1.29
NetMCU1_30: MCU1.30 UART.3 | length 746.8
  Signal2 w8: UART.3 240.31,199.61 245,204.29 245,240 320,315 320,395 360,435 545,435 585,475 630,475 685.31,530.31 MCU1.30
NetR1_2: R1.2 R2.1 U1A.3 | length 214
  Signal1 w10: R1.2 R2.1 614.14,293.36 620,287.5 620,215.98 625.86,210.12 U1A.3
NetR3_1: R3.1 U2.3 | length 64.1
  Signal1 w10: R3.1@265,494.14 270.86,500 U2.3
NetR3_2: R3.2 U2.2 | length 158.8
  Signal1 w10: R3.2 214.41,544.14 220.27,550 U2.2
NetR5_2: R5.2 R6.1 U1B.1 U1B.4 | length 872.3
  Signal1 w10: U1B.4 170.86,674.88 165,680.74 165,854.14 170.86,860 261.54,860 267.4,854.14 U1B.1@267.4,790 ; U1B.1@269.2,785 349.14,785 355,790.86 355,819.14 360.86,825 578.67,825 584.53,819.14 R5.2 R6.1
NetR6_2: R6.2 U3.3 | length 298.2
  Signal1 w10: R6.2 718,705.86 712.14,700 675.86,700 670,694.14 670,555.86 675.86,550 U3.3
NetR7_1: R7.1 R8.2 U3.2 | length 324
  Signal1 w10: U3.2 847.61,600 853.46,605.86 R7.1@853.46,740 ; R7.1 R7.1@853.46,740 ; R8.2 R7.1@853.46,740
NetR7_2: R7.2 R9.1 U3.1 | length 720.7
  Signal1 w10: U3.1 741.65,651.13 775,651.13 786.54,662.67 R7.2@786.54,750 ; R7.2@785,750 785,819.14 790.86,825 1029.14,825 1035,819.14 1035,730 1065,700 1154.14,700 1160,694.14 1160,665
NetR12_1: R12.1 U1A.1 U1A.4 | length 524.4
  Signal1 w10: R12.1 749.14,310 755,304.14 755,150.86 749.14,145 685.86,145 680,139.14 680,105.74 674.14,99.88 U1A.4 647.6,159.14 653.46,165 716.54,165 722.4,170.86 U1A.1
NetRb1_1: Rb1.1 Ri1.2 U2.4 | length 191.8
  Signal1 w10: Ri1.2 184.69,447.69 Rb1.1 ; Rb1.1@185.84,450 Rb1.1 ; U2.4 Rb1.1
NetRb2_1: Rb2.1 Ri2.2 U2.1 | length 191.7
  Signal1 w10: Rb2.1@185.84,545 Ri2.2@185.84,600 ; Ri2.2@190,600 U2.1
pads on no net: J3. J3.A2 J3.A3 J3.A8 J3.A10 J3.A11 J3.B2 J3.B3 J3.B8 J3.B10 J3.B11 MCU1.2 MCU1.3 MCU1.5 MCU1.6 MCU1.7 MCU1.13 MCU1.18 MCU1.19 MCU1.20 MCU1.23 MCU1.24 MCU1.25 MCU1.26 MCU1.27 MCU1.28 S1.5

## Polygon pours and split planes (outlines as drawn)
NetC0_2 on Ground "NETC0_2_L02_P000" (solid, pour order 0): 15,15 1385,15 1385,875 15,875
NetC0_2 on Power "NETC0_2_L03_P001" (solid, remove dead copper, pour order 1): 15,875 1385,875 1385,15 15,15

## Silkscreen, mask and mechanical layers (free items; w line width, h text height)
Board Shape:
  the board outline again, w10